# Altium PCB Grantv3.PcbDoc (part 1 of 3)
Units mm, origin at the board's own origin, x right, y up, seen from the top; angles counter-clockwise.
Board outline 132.82 x 71.6 mm, 2 copper layers (Top Layer, Bottom Layer), stack 1.448 mm thick; 97 components, 63 nets, 317 pads, 96 vias.
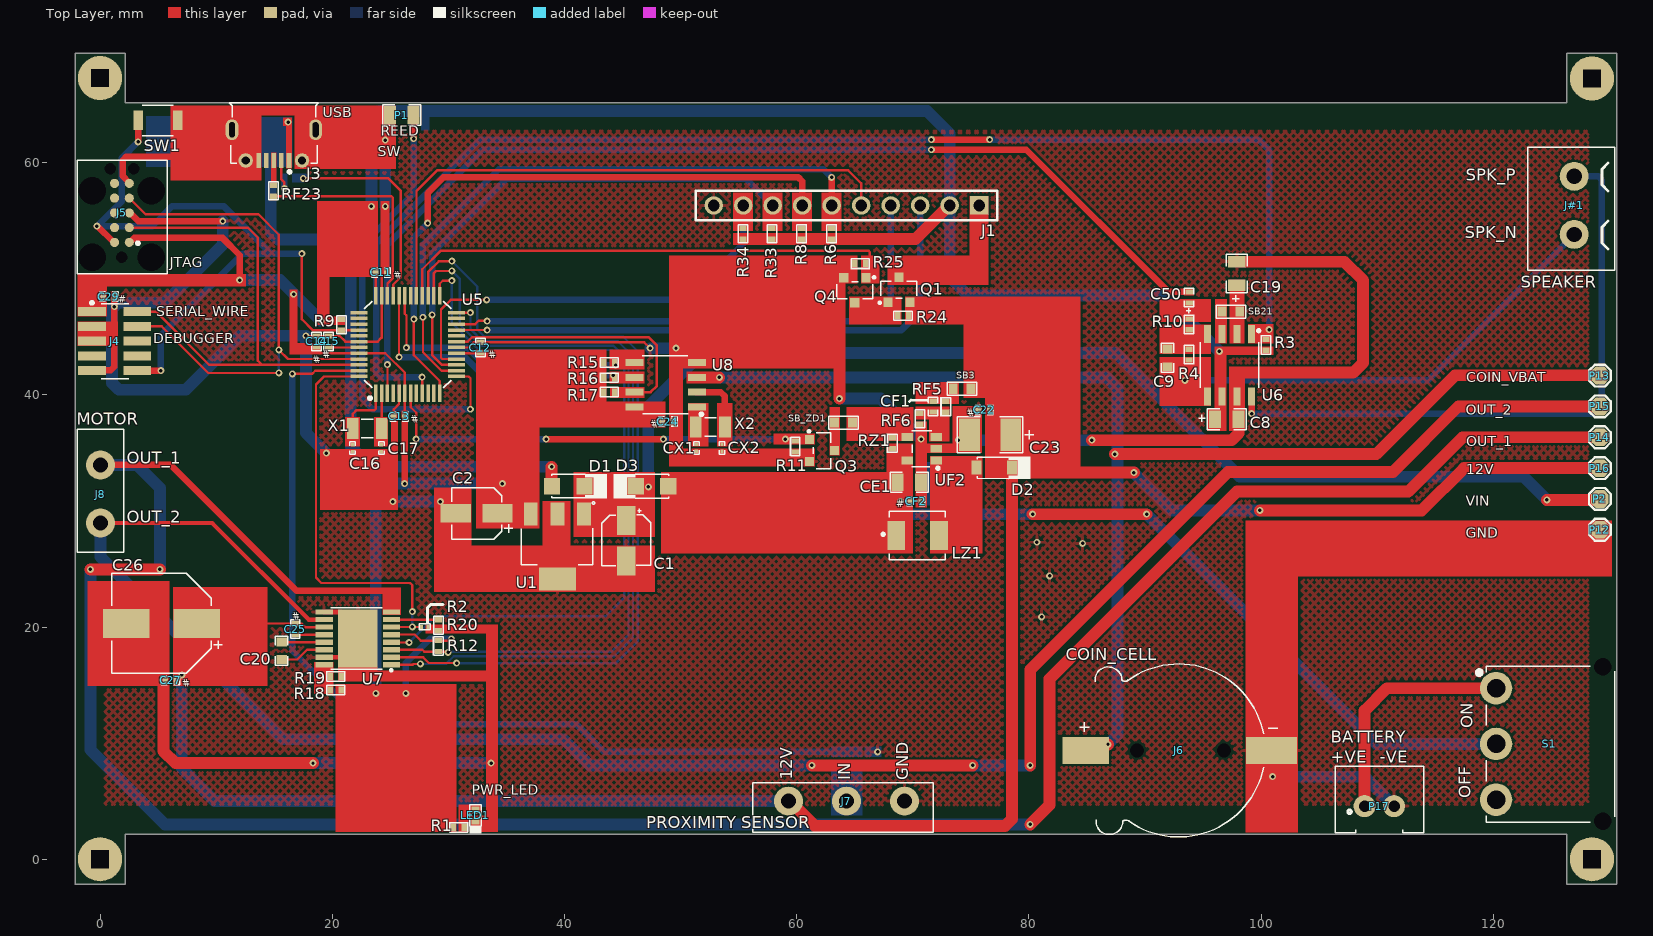
[diagram p0: Top Layer view]
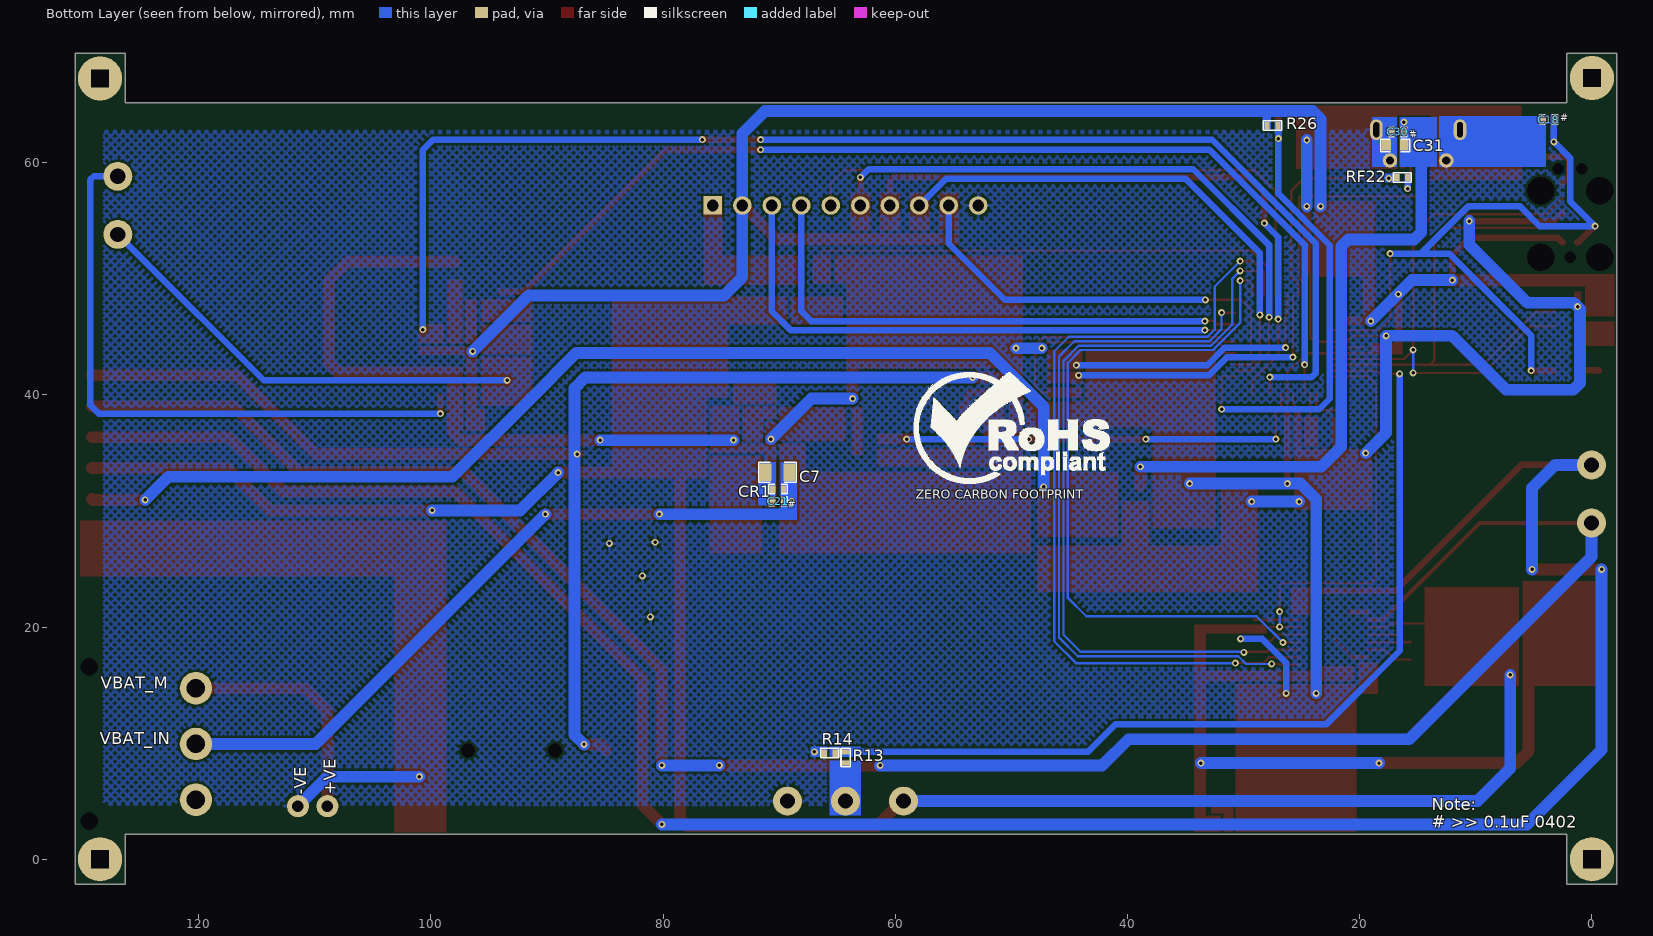
[diagram p1: Bottom Layer view, seen from below]
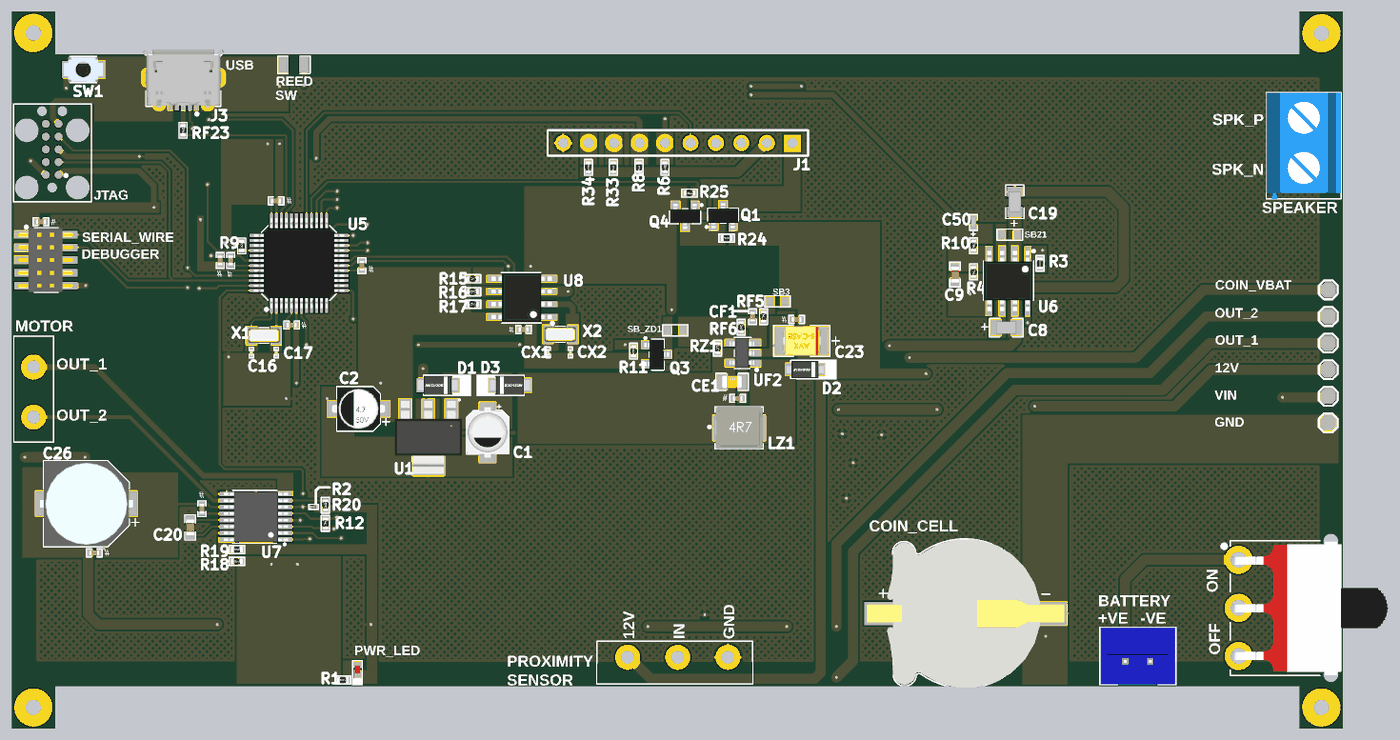
[diagram p3: 3D render of the assembled board from above, using the file's embedded part models]
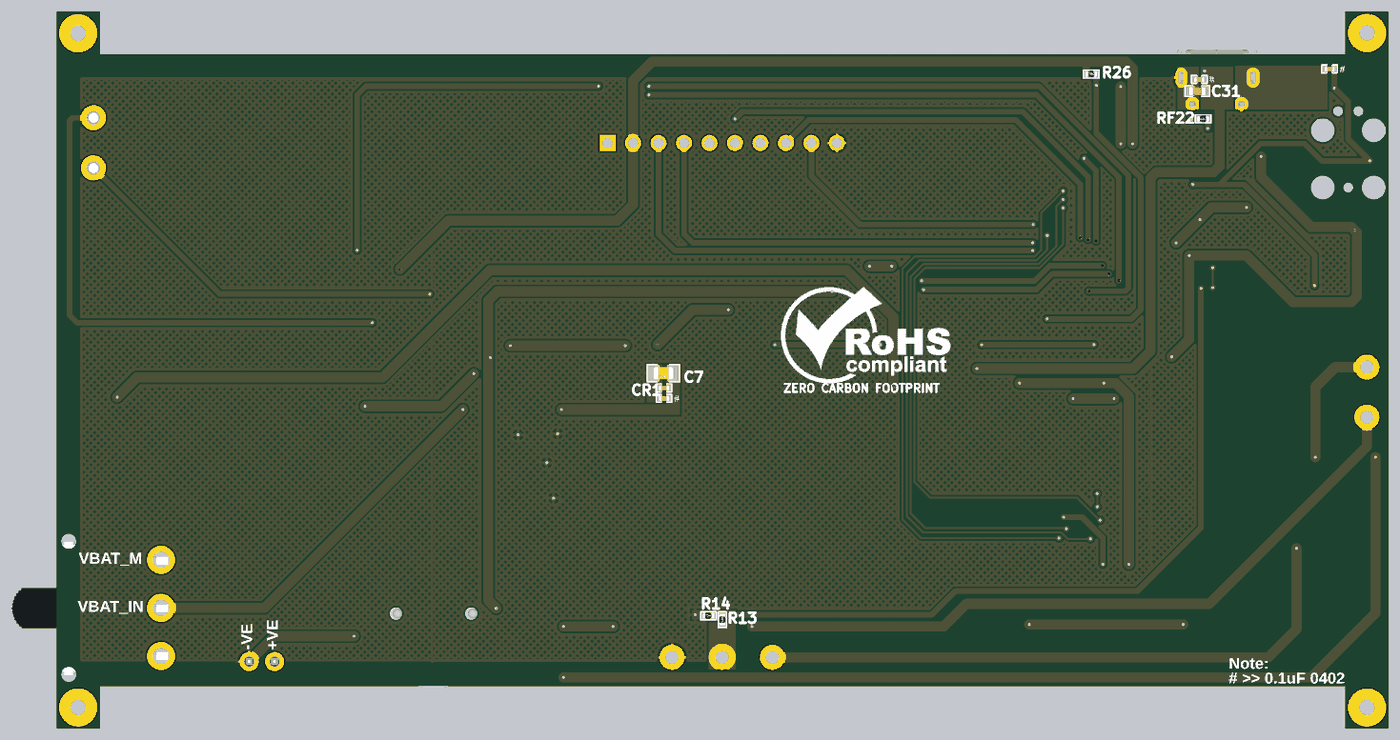
[diagram p4: 3D render of the assembled board from below, using the file's embedded part models]

## Layer stack, top to bottom
Top Solder: solder mask 0.0762, Solder Resist, Dk 3.5
Top Layer: signal copper 0.254
Dielectric 1: dielectric 0.9398, FR-4, Dk 4.8
Bottom Layer: signal copper 0.254
Bottom Solder: solder mask 0.0762, Solder Resist, Dk 3.5

## Board outline
-2.159,1.422 -2.159,64.44 -2.159,69.444 2.159,69.444 2.159,65.151 126.34,65.151 126.34,69.418 130.658,69.418 130.658,-2.159 126.34,-2.159 126.34,2.134 2.159,2.134 2.159,-2.159 -2.159,-2.159

## Design rules (kind name [scope] priority, off if disabled: settings)
Clearance [All] p1: gap=0.178 ignorepadtopadclearanceinfootprint=FALSE except(0.102: Arc-SMDPad Track-SMDPad SMDPad-SMDPad)
ComponentClearance [All] p1: gap=0 collisioncheckmode=3 verticalgap=0 showdistances=FALSE
MinimumSolderMaskSliver [All] p1: minsoldermaskwidth=0
PolygonConnect [All] p1: connectstyle=Relief reliefconductorwidth=0.254 reliefentries=4 polygonreliefangle="90 Angle" airgapwidth=0.254
RoutingVias [All] p1: holewidth=0.3 width=0.6 viastyle="Through Hole" minholewidth=0.3 minwidth=0.6 maxholewidth=0.3 maxwidth=0.6
SilkToSilkClearance [All] p1: silktosilkclearance=0
SilkToSolderMaskClearance [IsPad] p1: minsilkscreentomaskgap=0 clearancetoexposedcopper=TRUE
SolderMaskExpansion [All] p1: expansion=0.102 istentingtop=FALSE
Width [All] p1: maxlimit=1.016 minlimit=0.203 preferedwidth=0.559
26 further rules are at their usual default settings.

## Classes and differential pairs
component class U_OLED_Section: J1 Q1 Q4 R24 R25
component class U_Power_Section: C1 C2 D1 D3 LED1 P2 R1 U1
component class U_Audio_Amplifier_Section: C8 C9 C19 C50 J#1 R3 R4 R10 SB21 U6
component class U_Controller_Section: C11 C12 C13 C14 C15 C16 C17 C18 P1 R6 R8 R9 R26 R33 R34 SW1 U5 X1
component class U_Connector_Section: C29 C30 C31 J3 J4 J5 J6 J7 J8 P12 P13 P14 P15 P16 P17 RF22 RF23 S1
component class U_Peripheral_Section: C7 C20 C21 C22 C23 C24 C25 C26 C27 CE1 CF1 CF2 CR1 CX1 CX2 D2 LZ1 Q3 R2 R11 R12 R13 R14 R15 R16 R17 R18 R19 R20 RF5 RF6 RZ1 SB3 SB_ZD1 SS U7 U8 UF2 X2

## Components (designator, comment, footprint, x,y, rotation, side; value= is the part's Value field where it differs from the comment)
C1 "6.8uF" EEEHB1E6R8R 45.314,27.44 r270 top locked
C2 "10uF" RVT1E100M0405 32.439,29.794 r180 top locked
C7 "22uF" Cap0805 70.16,33.346 r0 bottom locked
C8 "1UF" TCP1A105M8R 97.053,37.897 r0 top locked value=1uF
C9 "25pF" "Cap 0603" 91.948,43.188 r270 top locked
C11 "0.1uF" "Cap 0402"#1 24.206,50.546 r0 top locked
C12 "0.1uF" "Cap 0402"#1 32.766,44.069 r90 top locked
C13 "0.1uF" "Cap 0402"#1 25.768,38.151 r180 top locked
C14 "0.1uF" "Cap 0402"#1 18.644,44.602 r90 top locked
C15 "0.1uF" "Cap 0402"#1 19.685,44.602 r90 top locked
C16 "20pF" "Cap 0201" 21.748,35.408 r90 top locked
C17 "20pF" "Cap 0201" 24.237,35.408 r90 top locked
C18 "0.1uF" "Cap 0402"#1 3.734,63.703 r0 bottom locked
C19 "1uF" TCP1A105M8R 97.917,50.452 r90 top locked
C20 "22nF" "Cap 0603" 15.639,17.956 r270 top locked
C21 "0.1uF" "Cap 0402"#1 70.096,30.836 r0 bottom locked
C22 "0.1uF" "Cap 0402"#1 76.149,38.71 r180 top locked
C23 "4.7UF" TAJB475K035RNJ 76.687,36.652 r0 top locked
C24 "0.1uF" "Cap 0402"#1 48.908,37.694 r0 top locked
C25 "0.1uF" "Cap 0402"#2 16.811,19.82 r270 top locked
C26 "100uF" UWX1E101MCL1GB 5.291,20.32 r180 top locked
C27 "0.1uF" "Cap 0402"#1 6.071,15.418 r180 top locked
C29 "0.1uF" "Cap 0402"#1 0.762,48.463 r0 top locked
C30 "0.1uF" "Cap 0402"#1 16.728,62.659 r0 bottom locked
C31 "4.7uF" "Cap 0603" 16.931,61.49 r0 bottom locked
C50 "330nF" TCTU1D334M8R 93.802,48.382 r90 top locked
CE1 "22uF" Cap0805 69.702,32.482 r0 top locked
CF1 "220pF" "Cap 0402"#1 71.755,38.989 r90 top locked
CF2 "0.1uF" "Cap 0402"#1 70.261,30.836 r0 top locked
CR1 "2.2uF" "Cap 0402"#1 70.096,31.877 r0 bottom locked
CX1 "20pF" "Cap 0201" 51.359,35.423 r90 top locked
CX2 "20pF" "Cap 0201" 53.569,35.423 r90 top locked
D1 "PMEG3010ER,115" SOD123W 40.335,32.136 r0 top locked
D2 "RB060M-30TR" SOD-123F 77.017,33.731 r0 top locked
D3 "PMEG3010ER,115" SOD123W 47.549,32.131 r180 top locked
J1 "C35445" C35445 64.289,56.314 r180 top locked
J3 "C10418" C10418 14.968,61.511 r180 top locked
J4 "20021121-00010C4LF" 20021121-00010C4LF 1.25,44.628 r270 top locked
J5 "TC2050-IDC" TC2050-IDC 1.88,51.867 r90 top locked
J6 "CR1220-2" CR1220-2 92.906,9.373 r0 top locked value=Cuctom
J7 "WJ301V-5.0-3P" WJ301V-5.0-3P 59.291,5.004 r0 top locked value=Custom
J8 "WJ301V-5.0-2P" WJ301V-5.0-2P 0.025,28.96 r270 top locked value=Custom
J#1 "WJ301V-5.0-2P" WJ301V-5.0-2P 126.975,58.826 r90 top locked value=Custom
LED1 "TJ-S1005SW4TGLC2R-A5" "LED 0402" 32.334,3.777 r270 top locked
LZ1 "MS0420-100M" MS0420-100M 70.413,27.889 r0 top locked value=10uH
P1 "SMD PAD" "SMD PAD" 25.988,64.105 r180 top locked
P2 "TEST POINT" "TEST POINT" 129.184,31.034 r270 top locked
P12 "Test Point" "TEST POINT" 129.184,28.377 r90 top locked
P13 "Test Point" "TEST POINT" 129.184,41.661 r0 top locked
P14 "Test Point" "TEST POINT" 129.184,36.347 r180 top locked
P15 "Test Point" "TEST POINT" 129.184,39.004 r180 top locked
P16 "Test Point" "TEST POINT" 129.184,33.691 r180 top locked
P17 "JST Connector" "JST Connector" 108.915,4.572 r0 top locked
Q1 "FDN338P" SOT23-3 68.809,49.06 r0 top locked
Q3 "ZVN3310FTA" SOT23-3 62.179,35.204 r270 top locked
Q4 "FDN335N" SOT23-3 65.014,49.001 r180 top locked
R1 "470R" Res0402#1 30.886,2.743 r180 top locked
R2 "1.5K" Res-0201 27.966,20.011 r180 top locked
R3 "20K" Res0402#1 100.432,44.305 r270 top locked
R4 "20K" Res0402#1 93.798,43.467 r90 top locked
R6 "10K" Res0402#1 63.017,53.886 r90 top locked
R8 "10K" Res0402#1 60.427,53.886 r90 top locked
R9 "20K" Res0402#1 20.777,46.038 r90 top locked
R10 "20K" Res0402#1 93.802,46.07 r90 top locked
R11 "10K" Res0402#1 59.876,35.547 r270 top locked
R12 "10K" Res0402#1 29.134,18.364 r270 top locked
R13 "133K" Res0402#2 64.27,8.763 r270 bottom locked
R14 "49.9K" Res0402#2 65.65,9.144 r0 bottom locked
R15 "10K" Res0402#1 43.853,42.769 r180 top locked
R16 "10K" Res0402#1 43.853,41.474 r180 top locked
R17 "10K" Res0402#1 43.853,40.229 r180 top locked
R18 "0R" Res0402#1 20.307,14.575 r180 top locked
R19 "0R" Res0402#1 20.307,15.744 r180 top locked
R20 "20K" Res0402#1 29.134,20.163 r90 top locked
R24 "47K" Res0402#1 69.164,46.812 r180 top
R25 "47K" Res0402#1 65.471,51.313 r0 top locked
R26 "1K" Res0402#2 27.508,63.195 r0 bottom locked
R33 "10K" Res0402#1 57.861,53.886 r90 top locked
R34 "10K" Res0402#2 55.372,53.886 r90 top locked
RF5 "118K" Res0402#1 72.847,38.976 r270 top locked
RF6 "13.3K" Res0402#1 70.612,37.935 r90 top locked
RF22 "0R" Res0402#1 16.345,58.725 r180 bottom locked
RF23 "0R" Res0402#1 14.935,57.582 r90 top locked
RZ1 "47K" Res0402#1 68.254,35.839 r270 top locked
S1 "SS-12D11L5" SS-12D11L5 124.841,9.931 r270 top locked value=Custom
SB3 "Solder Bridge" "Solder Bridge" 74.244,40.513 r0 top locked
SB21 "Solder Bridge" "Solder Bridge" 97.409,47.175 r0 top locked
SB_ZD1 "Solder Bridge" "Solder Bridge" 64.033,37.617 r180 top locked
SW1 "B3U-1000P" B3U-1000P 4.978,63.652 r0 top locked
U1 "SPX3940AM3-L-3-3/TR" SPX3940AM3-L-3-3/TR 39.395,26.948 r180 top locked
U5 "SAMD21G18A-AUT" SAMD21G18A-AUT 26.501,44.334 r90 top locked
U6 "LM4890MX/NOPB" SOIC-8 97.282,42.553 r270 top locked
U7 "DRV8876PWPR" 16HTSSOP 22.2,19.021 r180 top locked
U8 "MCP7940N-I/SN" MCP7940N-I/SN 48.714,40.869 r180 top locked
UF2 "LMR62014XMF/NOPB" SOT23-5 70.769,35.357 r180 top locked
X1 "NX3215SA-32.768K-STD-MUA-8" NX3215SA-32.768K-STD-MUA-8 23.013,37.11 r180 top locked
X2 "NX3215SA-32.768K-STD-MUA-8" NX3215SA-32.768K-STD-MUA-8 52.573,37.232 r180 top locked

## Footprints (in the part's own frame and the unit in brackets; to place one, negate y for a bottom-side part, rotate by r counter-clockwise, add the part's x,y. Pads: shape width x height; smd on the part's side, far side on the other; paste and mask are expansions set on the pad)
16HTSSOP [mm]
  rect 1.5x0.45 smd: 1(-2.9,2.275) 2(-2.9,1.625) 3(-2.9,0.975) 4(-2.9,0.325) 5(-2.9,-0.325) 6(-2.9,-0.975) 7(-2.9,-1.625) 8(-2.9,-2.275) 9(2.9,-2.275) 10(2.9,-1.625) 11(2.9,-0.975) 12(2.9,-0.325) 13(2.9,0.325) 14(2.9,0.975) 15(2.9,1.625) 16(2.9,2.275)
  rect 3.4x5 smd: 17(0,0)
  silkscreen extent -2.94,-2.64 2.31,2.81, body extent -3.2,-2.5 3.2,2.5, height 1.2
20021121-00010C4LF [mm]
  rect 0.76x2.4 smd: 1(-2.54,-1.95) 2(-2.54,1.95) 3(-1.27,-1.95) 4(-1.27,1.95) 5(0,-1.95) 6(0,1.95) 7(1.27,-1.95) 8(1.27,1.95) 9(2.54,-1.95) 10(2.54,1.95)
  silkscreen extent -3.43,-2.08 3.23,1.22, body extent -3.17,-2.78 3.18,2.72, height 4.5
B3U-1000P [mm] "SWITCH TACTILE SPST-NO 0.05A 12V"
  rect 0.82x1.72 smd: 1(-1.7,0) 2(1.7,0)
  silkscreen extent -1.35,-1.32 1.32,1.3, body extent -2,-1.26 2,1.24, height 1.6
C10418 [mm] "USB - Micro B Female USB 2 5 SMD USB Connectors RoHS"
  rect 0.4x1.25 smd: 1(-1.3,1.325) 2(-0.65,1.325) 3(0,1.325) 4(0.65,1.325) 5(1.3,1.325)
  round 1.25 hole 0.7: MH1(-2.425,1.325) MH2(2.425,1.325)
  oval 1.1x1.8 hole 0.5 slot 1.3 at 90 deg: MH3(3.6,-1.325) MH4(-3.6,-1.325)
  silkscreen extent -3.83,-3.63 3.83,2.43, body extent -4.02,-4.08 4.03,1.5, height 2.72
C35445 [mm]
  rect 1.6x1.6 hole 1: 1(-11.43,0)
  round 1.6 hole 1: 2(-8.89,0) 3(-6.35,0) 4(-3.81,0) 5(-1.27,0) 6(1.27,0) 7(3.81,0) 8(6.35,0) 9(8.89,0) 10(11.43,0)
  silkscreen extent -13,-1.28 12.98,1.27, body extent -12.95,-1.27 12.95,1.27, height 8.6
Cap0805 [mil] "SMD 0805"
  rect 40x60 smd: 1(-40,0) 2(40,0)
  silkscreen extent -64,-34 64,34, body extent -39,-25 39,25, height 30
"Cap 0201" [mm]
  rect 0.3x0.3 smd: 1(-0.3,0) 2(0.3,0)
  silkscreen extent -0.53,-0.23 0.53,0.23, body extent -0.3,-0.15 0.3,0.15, height 0.28
"Cap 0402"#1 [mil]
  rect 18x25 smd: 1(-18.5,0) 2(18.5,0)
  silkscreen extent -31,-16 31,16, body extent -20,-10 20,10, height 19
"Cap 0402"#2 [mil]
  rect 18x25 smd mask+2.36: 1(-18.5,0) 2(18.5,0)
  silkscreen extent -31,-16 31,16, body extent -20,-10 20,10, height 19
"Cap 0603" [mil]
  rect 30x35 smd: 1(-30,0) 2(30,0)
  silkscreen extent -49,-21 49,21, body extent -32,-16 31,16, height 34
CR1220-2 [mm]
  rect 4x2.3 smd: 1(-8,0)
  rect 4.4x2.3 smd: 2(8,0)
  round 0 hole 1.22 unplated: MH1(-3.6,0) MH2(3.9,0)
  silkscreen extent -8.5,-7.45 8.52,7.45, body extent -9.75,-7.45 9.95,7.45, height 4
EEEHB1E6R8R [mm] "EEE-HB1E6R8R"
  rect 2.5x1.6 smd: 1(-1.75,0) 2(1.75,0)
  silkscreen extent -2.74,-2.11 2.16,2.11, body extent -2.5,-2.15 2.5,2.15, height 5.8
"JST Connector" [mil] "2 Pin JST Connector"
  round 75 hole 39: 1(0,0) 2(100,0)
  silkscreen extent -100,-90 200,135, body extent -98,-89 198,135, height 284
"LED 0402" [mm]
  rect 0.62x0.72 smd: 1(-0.475,0) 2(0.475,0)
  silkscreen extent -0.91,-0.53 1.55,0.53, body extent -0.5,-0.25 0.51,0.25, height 0.45
MCP7940N-I/SN [mm]
  rect 1.55x0.6 smd: 1(-2.7,1.905) 2(-2.7,0.635) 3(-2.7,-0.635) 4(-2.7,-1.905) 5(2.7,-1.905) 6(2.7,-0.635) 7(2.7,0.635) 8(2.7,1.905)
  silkscreen extent -3.2,-2.51 2.03,2.67, body extent -3,-2.45 3,2.45, height 1.65
MS0420-100M [mm]
  rect 1.52x2.5 smd: 1(-1.85,0) 2(1.85,0)
  silkscreen extent -3.07,-2.1 2.41,2.1, body extent -2.37,-2.1 2.37,2.1, height 1.85
NX3215SA-32.768K-STD-MUA-8 [mm]
  rect 1x1.8 smd: 1(-1.25,0) 2(1.25,0)
  silkscreen extent -0.51,-0.79 0.51,0.79, body extent -1.6,-0.75 1.6,0.75, height 0.8
Res0402#1 [mil]
  rect 18x25 smd: 1(-18.5,0) 2(18.5,0)
  silkscreen extent -32,-17 32,16, body extent -23,-11 23,11, height 16
Res0402#2 [mil]
  rect 18x25 smd mask+4: 1(-18.5,0) 2(18.5,0)
  silkscreen extent -32,-17 32,16, body extent -23,-11 23,11, height 16
Res-0201 [mm]
  rect 0.27x0.37 smd: 1(-0.275,0) 2(0.275,0)
  silkscreen extent -0.48,-0.25 0.48,0.25, body extent -0.3,-0.15 0.3,0.15, height 0.29
RVT1E100M0405 [mm] "10uF 25V 5.4mm SMD"
  rect 2.6x1.6 smd: 1(-1.8,0) 2(1.8,0)
  silkscreen extent -3.1,-2.22 2.16,2.22, body extent -2.65,-2.15 2.65,2.15, height 5.7
SAMD21G18A-AUT [mm] "IC MCU 32BIT 256KB FLASH 48TQFP"
  rect 1.5x0.3 smd: 1(-4.2,2.75) 2(-4.2,2.25) 3(-4.2,1.75) 4(-4.2,1.25) 5(-4.2,0.75) 6(-4.2,0.25) 7(-4.2,-0.25) 8(-4.2,-0.75) 9(-4.2,-1.25) 10(-4.2,-1.75) 11(-4.2,-2.25) 12(-4.2,-2.75) 25(4.2,-2.75) 26(4.2,-2.25) 27(4.2,-1.75) 28(4.2,-1.25) 29(4.2,-0.75) 30(4.2,-0.25) 31(4.2,0.25) 32(4.2,0.75) 33(4.2,1.25) 34(4.2,1.75) 35(4.2,2.25) 36(4.2,2.75)
  rect 0.3x1.5 smd: 13(-2.75,-4.2) 14(-2.25,-4.2) 15(-1.75,-4.2) 16(-1.25,-4.2) 17(-0.75,-4.2) 18(-0.25,-4.2) 19(0.25,-4.2) 20(0.75,-4.2) 21(1.25,-4.2) 22(1.75,-4.2) 23(2.25,-4.2) 24(2.75,-4.2) 37(2.75,4.2) 38(2.25,4.2) 39(1.75,4.2) 40(1.25,4.2) 41(0.75,4.2) 42(0.25,4.2) 43(-0.25,4.2) 44(-0.75,4.2) 45(-1.25,4.2) 46(-1.75,4.2) 47(-2.25,4.2) 48(-2.75,4.2)
  silkscreen extent -4.75,-3.73 3.73,3.73, body extent -4.5,-4.5 4.5,4.5, height 1.42
"SMD PAD" [mil]
  rect 40x60 smd: 1(-40,0) 2(40,0)
  silkscreen extent -64,-34 64,34
SOD123W [mm] "DIODE SCHOTTKY 30V 1A SOD123W"
  rect 1.4x1.4 smd: A(-1.4,0) K(1.4,0)
  silkscreen extent -1.42,-1.07 3.33,1.07, body extent -2,-0.95 2,0.95, height 1.1
SOD-123F [mm]
  rect 0.85x1.2 smd: A(-1.525,0) K(1.525,0)
  silkscreen extent -1.48,-1 3.12,0.98, body extent -1.88,-0.88 1.87,0.82, height 1.2
SOIC-8 [mm]
  rect 1.55x0.6 smd: 1(-2.7,1.905) 2(-2.7,0.635) 3(-2.7,-0.635) 4(-2.7,-1.905) 5(2.7,-1.905) 6(2.7,-0.635) 7(2.7,0.635) 8(2.7,1.905)
  silkscreen extent -3.07,-2.51 1.96,2.62, body extent -3,-2.45 3,2.45, height 1.65
"Solder Bridge" [mil] "Solder Bridge ON"
  rect 30x35 smd: 1(-30,0) 2(30,0)
  silkscreen extent -50,-22 50,22
SOT23-3 [mm] "SOT23, 3-Leads, Body 2.9x1.3mm, Pitch 0.95mm, Lead Span 2.3mm - Reverse Pinning, IPC High Density"
  rect 0.8x0.8 smd: 1(-0.95,-1.075) 2(0.95,-1.075) 3(0,1.075)
  silkscreen extent -1.73,-1.19 1.55,0.74, body extent -1.5,-1.25 1.5,1.25, height 1.05
SOT23-5 [mil] "SOT23-5 Package"
  rect 40x27 smd: 1(-49.21,39.37) 2(-49.21,0) 3(-49.21,-39.37) 4(49.21,-39.37) 5(49.21,39.37)
  silkscreen extent -59,-61 33,70, body extent -46,-58 53,60, height 43
SPX3940AM3-L-3-3/TR [mm] "IC REG LINEAR 3.3V 1A SOT223"
  rect 1.2x2 smd: 1(-2.3,-2.8) 2(0,-2.8) 3(2.3,-2.8)
  rect 3.2x2 smd: 4(0,2.8)
  silkscreen extent -3.2,-3.84 3.1,1.6, body extent -3.35,-3.64 3.35,3.65, height 1.81
SS-12D11L5 [mm]
  round 2.8 hole 1.6: 1(-4.8,-4.6) 2(0,-4.6) 3(4.8,-4.6)
  round 0 hole 1.5 unplated: MH1(-6.65,4.6) MH2(6.65,4.6)
  silkscreen extent -6.71,-6.17 6.76,5.61, body extent -6.65,-5.39 6.7,10.3, height 6.85
TAJB475K035RNJ [mil]
  rect 70.87x110 smd: 1(-71,-3) 2(69,-3)
  silkscreen extent -112,-64 147,58, body extent -74,-61 72,55, height 77
TC2050-IDC [mil] "CBL PLUG-OF-NAILS 10-PIN W/LEGS"
  round 30.98 smd: 1(50,-25) 2(100,-25) 3(150,-25) 4(200,-25) 5(250,-25) 6(250,25) 7(200,25) 8(150,25) 9(100,25) 10(50,25)
  round 0 hole 93.5 unplated: MP1(0,-100) MP2(225,-100) MP3(225,100) MP4(0,100)
  round 0 hole 39.02 unplated: MP5(0,0) MP6(300,-39.96) MP7(300,39.96)
  silkscreen extent -56,-154 328,152
TCP1A105M8R [mil]
  rect 40x60 smd: 1(-40,0) 2(40,0)
  silkscreen extent -96,-36 66,36, body extent -39,-25 39,25, height 47
TCTU1D334M8R [mil]
  rect 18x25 smd: 1(-18.5,0) 2(18.5,0)
  silkscreen extent -53,-16 31,16, body extent -20,-10 20,10, height 22
"TEST POINT" [mil]
  oct 60x60 smd: 1(0,0)
  silkscreen extent -37,-37 37,37
UWX1E101MCL1GB [mm]
  rect 4x2.5 smd: 1(-3.05,0) 2(3.05,0)
  silkscreen extent -5.23,-4.3 4.27,4.3, body extent -4.65,-4.25 4.65,4.25, height 5.5
WJ301V-5.0-2P [mm]
  round 2.5 hole 1.3: 1(-5,0) 2(0,0)
  silkscreen extent -8.07,-1.98 2.5,2.01
WJ301V-5.0-3P [mm]
  round 2.5 hole 1.3: 1(0,0) 2(5,0) 3(10,0)
  silkscreen extent -3.1,-2.67 12.49,1.6

## Part data
C1: library part EEEHB1E6R8R, "CAP ALUM 6.8UF 20% 25V SMD", Case/Package=Radial, Leakage Current=3uA, Manufacturer=Panasonic, Manufacturer Part Number=EEE-HB1E6R8R, Max Operating Temperature=105°C, Min Operating Temperature=-40°C, Package Quantity=2000, Ripple Current=25mA, Supplier Part Number 1=PCE4142CT-ND, Tolerance=20%, Voltage=25V, Capacitance=6.8uF, Category="Aluminum Electrolytic Capacitors", ComponentLink1Description=https://datasheet.ciiva.com/11784/0900766b806bc524-11784635.pdf?src-supplier=RSComponents, ComponentLink1URL=https://datasheet.ciiva.com/11784/0900766b806bc524-11784635.pdf?src-supplier=RSComponents, ComponentLink2Description=https://datasheet.ciiva.com/7903/1790623-7903207.pdf?src-supplier=Element14, ComponentLink2URL=https://datasheet.ciiva.com/7903/1790623-7903207.pdf?src-supplier=Element14, ComponentLink3Description=https://datasheet.ciiva.com/14592/70068251-14592830.pdf?src-supplier=Allied+Electronics, ComponentLink3URL=https://datasheet.ciiva.com/14592/70068251-14592830.pdf?src-supplier=Allied+Electronics, ComponentLink4Description=https://datasheet.ciiva.com/14596/70068251-14596488.pdf?src-supplier=Allied+Electronics, ComponentLink4URL=https://datasheet.ciiva.com/14596/70068251-14596488.pdf?src-supplier=Allied+Electronics, ComponentLink5Description=https://datasheet.ciiva.com/11681/aba0000ce4-11681133.pdf?src-supplier=Avnet, ComponentLink5URL=https://datasheet.ciiva.com/11681/aba0000ce4-11681133.pdf?src-supplier=Avnet, ComponentLink6Description=https://datasheet.ciiva.com/30226/16aba0000ce4-30226095.pdf?src-supplier=Onlinecomponents.com, ComponentLink6URL=https://datasheet.ciiva.com/30226/16aba0000ce4-30226095.pdf?src-supplier=Onlinecomponents.com, Construction=Cylindrical, Diameter=4mm, Height=5.8mm, Height - Seated (Max)=0.228inch, Lead Free="Lead Free", Length=5.5mm, Life (Hours)=2000Hour, Mount="Surface Mount,PCB", Packaging="Tape and Reel", Polarity=Polar, Pricing 1="1=0.43000, 10=0.29300, 50=0.19560, 100=0.16620, 500=0.11730, 1000=0.10264 (USD)", Radiation Hardening=No, REACH SVHC=Unknown, Ripple Current (AC)=25mA, RoHS=Yes, RoHS Compliant=Yes, Series=HB, Stock 1=1546, Supplier 1=Digi-Key, Termination=SMD/SMT, Voltage Rating=25V, Voltage Rating (DC)=25V, Width=650um
C2: library part RVT1E100M0405, "CAP ALUM 10uF 25V SMD", Manufacturer=ROQANG, Operating Temperature=-45℃~+105℃, Rated Voltage=25V, Tolerance=±20%, Capacitance=10uF, L=5.4mm, φD=4mm
C7 CE1: library part GRM21BR61E226ME44L, "CAP CER 22UF 25V X5R 0805", Case Code (Imperial)=0805, Case Code (Metric)=2012, Dielectric=X5R, Manufacturer=Murata, Max Operating Temperature=85°C, Min Operating Temperature=-55°C, Package Quantity=3000, Supplier Part Number 1=490-10749-1-ND, Tolerance=20%, Voltage=25V, Capacitance=22uF, Case/Package=0805, ComponentLink1Description=http://www.farnell.com/datasheets/2048737.pdf?src-supplier=Farnell, ComponentLink1URL=http://www.farnell.com/datasheets/2048737.pdf?src-supplier=Farnell, ComponentLink2Description=http://www.farnell.com/datasheets/2048737.pdf?src-supplier=Element14, ComponentLink2URL=http://www.farnell.com/datasheets/2048737.pdf?src-supplier=Element14, Composition=Ceramic, Depth=1.25mm, Height=1.25mm, Lead Free="Lead Free", Length=2mm, Manufacturer Part Number=GRM21BR61E226ME44L, Material=Ceramic, Mount="Surface Mount", Packaging="Tape and Reel", Pricing 1="1=0.54, 10=0.383, 100=0.2521, 500=0.18672, 1000=0.15871 (USD)", REACH SVHC="No SVHC", Stock 1=469852, Supplier 1=Digi-Key, Termination=SMD/SMT, Thickness=0.057inch, Voltage Rating=25V, Voltage Rating (DC)=25V, Weight=0.000335oz, Width=1.25mm
C8 C19: library part TCP1A105M8R, "1uF 10V ±20% 0805 Tantalum Capacitors ROHS", Manufacturer=ROHM, Package=0805, ComponentLink1Description=LCSC, ComponentLink1URL=https://lcsc.com/product-detail/Tantalum-Capacitors_ROHM-Semicon-TCP1A105M8R_C1952948.html, Manufacturer Part No=TCP1A105M8R
C9: library part CC0603JRNPO9BN250, "CAP CER 25PF 50V C0G/NPO 0603", Manufacturer=YAGEO, Package=0603, Manufacturer Part No=CC0603JRNPO9BN250
C11 C12 C13 C14: library part CC0402KRX7R7BB104, "CAP CER 0.1UF 16V X7R 0402", Capacitance=100nF, Case/Package=0402, Case Code (Metric)=1005, Dielectric=X7R, Manufacturer=Yageo, Max Operating Temperature=125°C, Min Operating Temperature=-55°C, Package Quantity=1, Supplier Part Number 1=311-1338-1-ND, Tolerance=10%, Voltage=16V, Case Code (Imperial)=0402, ComponentLink1Description=http://www.yageo.com/documents/recent/UPY-GPHC_X7R_6.3V-to-50V_8.pdf?src-supplier=Avnet+Europe, ComponentLink1URL=http://www.yageo.com/documents/recent/UPY-GPHC_X7R_6.3V-to-50V_8.pdf?src-supplier=Avnet+Europe, ComponentLink2Description=http://www.yageo.com/documents/recent/UPY-GPHC_X7R_6.3V-to-50V_18.pdf?src-supplier=Digi-Key, ComponentLink2URL=http://www.yageo.com/documents/recent/UPY-GPHC_X7R_6.3V-to-50V_18.pdf?src-supplier=Digi-Key, ComponentLink3Description=http://www.yageo.com/documents/recent/UPY-GPHC_X7R_6.3V-to-50V_8.pdf?src-supplier=Avnet, ComponentLink3URL=http://www.yageo.com/documents/recent/UPY-GPHC_X7R_6.3V-to-50V_8.pdf?src-supplier=Avnet, ComponentLink4Description=http://www.yageo.com/documents/recent/UPY-GPHC_X7R_6.3V-to-50V_18.pdf?src-supplier=Mouser, ComponentLink4URL=http://www.yageo.com/documents/recent/UPY-GPHC_X7R_6.3V-to-50V_18.pdf?src-supplier=Mouser, ComponentLink5Description=http://www.farnell.com/datasheets/2167236.pdf?src-supplier=Element14, ComponentLink5URL=http://www.farnell.com/datasheets/2167236.pdf?src-supplier=Element14, ComponentLink6Description=http://www.farnell.com/datasheets/1489800.pdf?src-supplier=Element14, ComponentLink6URL=http://www.farnell.com/datasheets/1489800.pdf?src-supplier=Element14, Composition=Ceramic, Depth=0.5mm, Halogen Free="Halogen Free", Height=0.5mm, Lead Free="Lead Free", Length=1mm, Manufacturer Part Number=CC0402KRX7R7BB104, Mount="Surface Mount", Number of Pins=2, Packaging="Tape and Reel", Pricing 1="1=0.1, 10=0.034, 100=0.015, 500=0.0107, 1000=0.00841, 2500=0.00764, 5000=0.00703 (USD)", Radiation Hardening=No, REACH SVHC="No SVHC", Stock 1=16982736, Supplier 1=Digi-Key, Termination=SMD/SMT, Thickness=0.022inch, Voltage Rating=16V, Voltage Rating (DC)=16V, Width=0.02inch
C15 C18 C21 C22 C24 C25 C27 C29 C30 CF2: library part CC0402KRX7R7BB104, "CAP CER 0.1UF 16V X7R 0402", Capacitance=100nF, Case Code (Imperial)=0402, Case Code (Metric)=1005, Dielectric=X7R, Manufacturer=Yageo, Max Operating Temperature=125°C, Min Operating Temperature=-55°C, Package Quantity=1, Supplier Part Number 1=311-1338-1-ND, Tolerance=10%, Voltage=16V, Case/Package=0402, ComponentLink1Description=http://www.yageo.com/documents/recent/UPY-GPHC_X7R_6.3V-to-50V_8.pdf?src-supplier=Avnet+Europe, ComponentLink1URL=http://www.yageo.com/documents/recent/UPY-GPHC_X7R_6.3V-to-50V_8.pdf?src-supplier=Avnet+Europe, ComponentLink2Description=http://www.yageo.com/documents/recent/UPY-GPHC_X7R_6.3V-to-50V_18.pdf?src-supplier=Digi-Key, ComponentLink2URL=http://www.yageo.com/documents/recent/UPY-GPHC_X7R_6.3V-to-50V_18.pdf?src-supplier=Digi-Key, ComponentLink3Description=http://www.yageo.com/documents/recent/UPY-GPHC_X7R_6.3V-to-50V_8.pdf?src-supplier=Avnet, ComponentLink3URL=http://www.yageo.com/documents/recent/UPY-GPHC_X7R_6.3V-to-50V_8.pdf?src-supplier=Avnet, ComponentLink4Description=http://www.yageo.com/documents/recent/UPY-GPHC_X7R_6.3V-to-50V_18.pdf?src-supplier=Mouser, ComponentLink4URL=http://www.yageo.com/documents/recent/UPY-GPHC_X7R_6.3V-to-50V_18.pdf?src-supplier=Mouser, ComponentLink5Description=http://www.farnell.com/datasheets/2167236.pdf?src-supplier=Element14, ComponentLink5URL=http://www.farnell.com/datasheets/2167236.pdf?src-supplier=Element14, ComponentLink6Description=http://www.farnell.com/datasheets/1489800.pdf?src-supplier=Element14, ComponentLink6URL=http://www.farnell.com/datasheets/1489800.pdf?src-supplier=Element14, Composition=Ceramic, Depth=0.5mm, Halogen Free="Halogen Free", Height=0.5mm, Lead Free="Lead Free", Length=1mm, Manufacturer Part Number=CC0402KRX7R7BB104, Mount="Surface Mount", Number of Pins=2, Packaging="Tape and Reel", Pricing 1="1=0.1, 10=0.034, 100=0.015, 500=0.0107, 1000=0.00841, 2500=0.00764, 5000=0.00703 (USD)", Radiation Hardening=No, REACH SVHC="No SVHC", Stock 1=16982736, Supplier 1=Digi-Key, Termination=SMD/SMT, Thickness=0.022inch, Voltage Rating=16V, Voltage Rating (DC)=16V, Width=0.02inch
C16 C17 CX1 CX2: library part GJM0336C1E200JB01D, "CAP CER 20PF 25V C0H 0201", Case Code (Imperial)=0201, Case Code (Metric)=0603, Manufacturer=Murata, Max Operating Temperature=125°C, Min Operating Temperature=-55°C, Supplier Part Number 1=490-13313-1-ND, Tolerance=5%, Voltage Rating=25V, Capacitance=20pF, Case/Package=0201, ComponentLink1Description=http://www.mouser.com/ds/2/281/c02e-2905.pdf?src-supplier=Mouser, ComponentLink1URL=http://www.mouser.com/ds/2/281/c02e-2905.pdf?src-supplier=Mouser, ComponentLink2Description=http://search.murata.co.jp/Ceramy/image/img/A01X/partnumbering_e_01.pdf?src-supplier=Digi-Key, ComponentLink2URL=http://search.murata.co.jp/Ceramy/image/img/A01X/partnumbering_e_01.pdf?src-supplier=Digi-Key, Lead Free="Lead Free", Length=0.024inch, Manufacturer Part Number=GJM0336C1E200JB01D, Mount="Surface Mount", Packaging="Tape and Reel", Pricing 1="1=0.1, 10=0.074, 100=0.0329, 500=0.02348, 1000=0.01845, 2500=0.01678, 5000=0.01543 (USD)", Stock 1=13650, Supplier 1=Digi-Key, Termination=SMD/SMT, Thickness=0.013inch, Voltage Rating (DC)=25V, Width=0.012inch
C20: library part CGA3E2X7R2A223K080AA, "CAP CER 0.022UF 100V X7R 0603", Case Code (Imperial)=0603, Case Code (Metric)=1608, Dielectric=X7R, Manufacturer=TDK, Max Operating Temperature=125°C, Min Operating Temperature=-55°C, Package Quantity=1, Ratings=AEC-Q200, Resistor Type=Ceramic, Supplier Part Number 1=445-5814-1-ND, Tolerance=10%, Voltage Rating=100V, Capacitance=22nF, Case/Package=0603, Category="Ceramic Capacitors", ComponentLink1Description=https://datasheet.ciiva.com/22725/1735406-22725648.pdf?src-supplier=Element14, ComponentLink1URL=https://datasheet.ciiva.com/22725/1735406-22725648.pdf?src-supplier=Element14, ComponentLink2Description=https://datasheet.ciiva.com/24218/cga3e2x7r2a223k080aa-266292-24218959.pdf?src-supplier=Mouser, ComponentLink2URL=https://datasheet.ciiva.com/24218/cga3e2x7r2a223k080aa-266292-24218959.pdf?src-supplier=Mouser, ComponentLink3Description=https://datasheet.ciiva.com/7975/1807242-7975349.pdf?src-supplier=Element14, ComponentLink3URL=https://datasheet.ciiva.com/7975/1807242-7975349.pdf?src-supplier=Element14, Depth=0.8mm, Height=0.8mm, Length=1.6mm, Manufacturer Part Number=CGA3E2X7R2A223K080AA, Mount="Surface Mount", Packaging="Tape and Reel", Pricing 1="1=0.11000, 10=0.07600, 50=0.04340, 100=0.03590, 500=0.02516, 1000=0.02083 (USD)", REACH SVHC="No SVHC", RoHS=Yes, RoHS Compliant=Yes, Series=CGA, Stock 1=56079, Supplier 1=Digi-Key, Termination=SMD/SMT, Thickness=0.035inch, Voltage Rating (DC)=100V, Weight=7.1E-05oz, Width=0.031inch
C23: library part TAJB475K035RNJ, "CAP TANT 4.7UF 10% 35V 1411", Capacitance=4.7uF, Case Code (Imperial)=1210, Case Code (Metric)=3528, Dielectric Material=Tantalum, ESR (Equivalent Series Resistance)=3.1R, Leakage Current=1.6uA, Manufacturer="Kyocera AVX", Max Operating Temperature=125°C, Min Operating Temperature=-55°C, Package Quantity=1, Supplier Part Number 1=478-1691-1-ND, Tolerance=20%, Voltage=35V, Case/Package=1210, ComponentLink1Description=http://uk.rs-online.com/webdocs/0ccd/0900766b80ccdc61.pdf?src-supplier=RSComponents, ComponentLink1URL=http://uk.rs-online.com/webdocs/0ccd/0900766b80ccdc61.pdf?src-supplier=RSComponents, ComponentLink2Description=http://www.farnell.com/datasheets/1826076.pdf?src-supplier=Element14, ComponentLink2URL=http://www.farnell.com/datasheets/1826076.pdf?src-supplier=Element14, ComponentLink3Description=http://datasheets.avx.com/TAJ.pdf?src-supplier=Digi-Key, ComponentLink3URL=http://datasheets.avx.com/TAJ.pdf?src-supplier=Digi-Key, ComponentLink4Description=http://www.avx.com/docs/Catalogs/taj.pdf?src-supplier=Farnell, ComponentLink4URL=http://www.avx.com/docs/Catalogs/taj.pdf?src-supplier=Farnell, ComponentLink5Description=https://www.alliedelec.com/m/d/9166fb755e7ffffad4c533f86d810ce4.pdf?src-supplier=Allied+Electronics, ComponentLink5URL=https://www.alliedelec.com/m/d/9166fb755e7ffffad4c533f86d810ce4.pdf?src-supplier=Allied+Electronics, ComponentLink6Description=https://www.distrelec.biz/Web/Downloads/_e/ng/taj_ENG.pdf?mime=application%2Fpdf&src-supplier=Distrelec, ComponentLink6URL=https://www.distrelec.biz/Web/Downloads/_e/ng/taj_ENG.pdf?mime=application%2Fpdf&src-supplier=Distrelec, ComponentLink7Description=http://www.avx.com/docs/catalogs/taj.pdf?src-supplier=Avnet+Europe, ComponentLink7URL=http://www.avx.com/docs/catalogs/taj.pdf?src-supplier=Avnet+Europe, ComponentLink8Description=http://www.avx.com/docs/catalogs/taj.pdf?src-supplier=Avnet, ComponentLink8URL=http://www.avx.com/docs/catalogs/taj.pdf?src-supplier=Avnet, ComponentLink9Description=http://www.avxcorp.com/docs/Catalogs/taj.pdf?src-supplier=Future+Electronics, ComponentLink9URL=http://www.avxcorp.com/docs/Catalogs/taj.pdf?src-supplier=Future+Electronics, ComponentLink10Description=http://www.mouser.com/ds/2/40/taj-776811.pdf?src-supplier=Mouser, ComponentLink10URL=http://www.mouser.com/ds/2/40/taj-776811.pdf?src-supplier=Mouser, ComponentLink11Description=https://www.verical.com/server-webapp/html/getDatasheet?partID=149140&src-supplier=Verical, ComponentLink11URL=https://www.verical.com/server-webapp/html/getDatasheet?partID=149140&src-supplier=Verical, Depth=2.8mm, Dissipation Factor=6%, Features="General Purpose", Height=1.9mm, Height - Seated (Max)=0.083inch, Lead Free="Lead Free", Length=3.5mm, Manufacturer Part Number=TAJB475K035RNJ, Mount="Surface Mount,PCB", Number of Pins=2, Packaging="Tape and Reel", Polarity=Polar, Pricing 1="1=0.71, 10=0.505, 100=0.3322, 500=0.2461, 1000=0.20919 (USD)", Radiation Hardening=No, REACH SVHC="No SVHC", Stock 1=3949, Supplier 1=Digi-Key, Termination=SMD/SMT, Voltage Rating=35V, Voltage Rating (DC)=35V, Weight=0.000564oz, Width=2.8mm
C26: library part UWX1E101MCL1GB, "CAP ALUM 100UF 20% 25V SMD", Case/Package=Radial, Dielectric Material=Aluminium, Leakage Current=3uA, Manufacturer=Nichicon, Max Operating Temperature=85°C, Min Operating Temperature=-40°C, Package Quantity=1000, Ripple Current=110mA, Supplier Part Number 1=493-2113-6-ND, Tolerance=20%, Voltage=25V, Capacitance=100uF, Category="Aluminum Electrolytic Capacitors", ComponentLink1Description=http://nichicon-us.com/english/products/pdfs/e-uwx.pdf?src-supplier=Digi-Key, ComponentLink1URL=http://nichicon-us.com/english/products/pdfs/e-uwx.pdf?src-supplier=Digi-Key, ComponentLink2Description=http://www.nichicon.co.jp/english/products/pdfs/e-ch_ref.pdf?src-supplier=Mouser, ComponentLink2URL=http://www.nichicon.co.jp/english/products/pdfs/e-ch_ref.pdf?src-supplier=Mouser, ComponentLink3Description=http://www.nichicon.co.jp/english/products/pdfs/e-wx.pdf?src-supplier=Avnet, ComponentLink3URL=http://www.nichicon.co.jp/english/products/pdfs/e-wx.pdf?src-supplier=Avnet, ComponentLink4Description=http://uk.rs-online.com/webdocs/0fa3/0900766b80fa3a90.pdf?src-supplier=RSComponents, ComponentLink4URL=http://uk.rs-online.com/webdocs/0fa3/0900766b80fa3a90.pdf?src-supplier=RSComponents, ComponentLink5Description=http://nichicon-us.com/english/products/pdfs/e-wx.pdf?src-supplier=Future+Electronics, ComponentLink5URL=http://nichicon-us.com/english/products/pdfs/e-wx.pdf?src-supplier=Future+Electronics, ComponentLink6Description=http://www.nichicon.co.jp/english/products/pdfs/e-ch_ref.pdf?src-supplier=Avnet+Europe, ComponentLink6URL=http://www.nichicon.co.jp/english/products/pdfs/e-ch_ref.pdf?src-supplier=Avnet+Europe, ComponentLink7Description=http://www.farnell.com/datasheets/2364658.pdf?src-supplier=Element14, ComponentLink7URL=http://www.farnell.com/datasheets/2364658.pdf?src-supplier=Element14, ComponentLink8Description=https://datasheet.ciiva.com/11778/0900766b80fa3a90-11778418.pdf?src-supplier=RSComponents, ComponentLink8URL=https://datasheet.ciiva.com/11778/0900766b80fa3a90-11778418.pdf?src-supplier=RSComponents, ComponentLink9Description=https://datasheet.ciiva.com/17527/e-wx-17527624.pdf?src-supplier=Avnet+Europe, ComponentLink9URL=https://datasheet.ciiva.com/17527/e-wx-17527624.pdf?src-supplier=Avnet+Europe, ComponentLink10Description=https://datasheet.ciiva.com/5361/e-wx-11809-5361100.pdf?src-supplier=Mouser, ComponentLink10URL=https://datasheet.ciiva.com/5361/e-wx-11809-5361100.pdf?src-supplier=Mouser, ComponentLink11Description=https://datasheet.ciiva.com/28458/1912851-28458684.pdf?src-supplier=Element14, ComponentLink11URL=https://datasheet.ciiva.com/28458/1912851-28458684.pdf?src-supplier=Element14, ComponentLink12Description=https://datasheet.ciiva.com/96/e-wx-96650.pdf?src-supplier=Digi-Key, ComponentLink12URL=https://datasheet.ciiva.com/96/e-wx-96650.pdf?src-supplier=Digi-Key, ComponentLink13Description=https://datasheet.ciiva.com/96/e-wx-96651.pdf?src-supplier=Digi-Key, ComponentLink13URL=https://datasheet.ciiva.com/96/e-wx-96651.pdf?src-supplier=Digi-Key, ComponentLink14Description=https://datasheet.ciiva.com/96/e-wx-96652.pdf?src-supplier=Digi-Key, ComponentLink14URL=https://datasheet.ciiva.com/96/e-wx-96652.pdf?src-supplier=Digi-Key, ComponentLink15Description=https://datasheet.ciiva.com/11687/e-wx-11687148.pdf?src-supplier=Avnet, ComponentLink15URL=https://datasheet.ciiva.com/11687/e-wx-11687148.pdf?src-supplier=Avnet, ComponentLink16Description=https://datasheet.ciiva.com/16512/e-wx-16512638.pdf?src-supplier=Future+Electronics, ComponentLink16URL=https://datasheet.ciiva.com/16512/e-wx-16512638.pdf?src-supplier=Future+Electronics, Construction=Cylindrical, Diameter=8mm, Dissipation Factor=0.14%, Height=5.4mm, Height - Seated (Max)=0.213inch, Lead Diameter=0.8mm, Lead Free="Lead Free", Lead Pitch=2.3mm, Length=5.4mm, Life (Hours)=2000Hour, Manufacturer Part Number=UWX1E101MCL1GB, Mount="Surface Mount", Number of Pins=2, Packaging="Tape and Reel", Polarity=Polar, Pricing 1="1=0.43, 10=0.301, 50=0.211, 100=0.1808, 500=0.13558 (USD)", Pricing 2="1=0.43000, 10=0.30100, 50=0.21100, 100=0.18080, 500=0.13558 (USD)", Radiation Hardening=No, REACH SVHC="No SVHC", Ripple Current (AC)=110mA, RoHS=Yes, RoHS Compliant=Yes, Series=WX, Stock 1=30613, Stock 2=25010, Supplier 1=Digi-Key, Supplier 2=Digi-Key, Supplier Part Number 2=493-2113-1-ND, Termination=SMD/SMT, Voltage Rating=25V, Voltage Rating (DC)=25V, Weight=0.01lb, Width=0.25inch
C31: library part CL10A475KA8NQNC, "CAP CER 4.7UF 25V X5R 0603", Case Code (Imperial)=0603, Case Code (Metric)=1608, Dielectric=X5R, Manufacturer=Samsung, Max Operating Temperature=85°C, Min Operating Temperature=-55°C, Package Quantity=1, Supplier Part Number 1=1276-1900-1-ND, Tolerance=10%, Voltage Rating=25V, Capacitance=4.7uF, Case/Package=0603, ComponentLink1Description=http://www.samsungsem.com/kr/support/product-search/mlcc/CL10A475KA8NQNC.jsp?src-supplier=Digi-Key, ComponentLink1URL=http://www.samsungsem.com/kr/support/product-search/mlcc/CL10A475KA8NQNC.jsp?src-supplier=Digi-Key, Contact Plating=Tin, Depth=0.8mm, Lead Free="Lead Free", Length=1.6mm, Manufacturer Part Number=CL10A475KA8NQNC, Mount="Surface Mount", Packaging="Tape and Reel", Pricing 1="1=0.37, 10=0.255, 100=0.1528, 500=0.11456, 1000=0.09675 (USD)", Stock 1=2252340, Supplier 1=Digi-Key, Termination=Wraparound, Thickness=0.035inch, Width=0.031inch
C50: library part TCTU1D334M8R, "CAP TANT 0.33 uF 20 V ±20% 0402", Case Code (Imperial)=0402, Case Code (Metric)=1005, Leakage Current=700nA, Manufacturer=Rohm, Max Operating Temperature=125°C, Min Operating Temperature=-55°C, Package Quantity=10000, Supplier Part Number 1=511-1684-1-ND, Tolerance=20%, Voltage Rating=20V, Capacitance=330nF, Case/Package=0402, Category="Tantalum Capacitors", ComponentLink1Description=https://datasheet.ciiva.com/29503/tct-u-29503913.pdf?src-supplier=Digi-Key, ComponentLink1URL=https://datasheet.ciiva.com/29503/tct-u-29503913.pdf?src-supplier=Digi-Key, ComponentLink2Description=https://datasheet.ciiva.com/29503/tct-u-29503914.pdf?src-supplier=Digi-Key, ComponentLink2URL=https://datasheet.ciiva.com/29503/tct-u-29503914.pdf?src-supplier=Digi-Key, ComponentLink3Description=https://datasheet.ciiva.com/29503/tct-u-29503915.pdf?src-supplier=Digi-Key, ComponentLink3URL=https://datasheet.ciiva.com/29503/tct-u-29503915.pdf?src-supplier=Digi-Key, Dissipation Factor=20%, Features="General Purpose", Height=0.6mm, Height - Seated (Max)=0.024inch, Lead Free="Lead Free", Length=0.039inch, Manufacturer Part Number=TCTU1D334M8R, Mount="Surface Mount", Packaging="Tape and Reel", Pricing 1="1=0.52000, 10=0.36800, 50=0.27800, 100=0.24220, 500=0.17940, 1000=0.15249, 2500=0.14352, 5000=0.13455 (USD)", RoHS=Yes, RoHS Compliant=Yes, Stock 1=28079, Supplier 1=Digi-Key, Termination=SMD/SMT, Voltage Rating (DC)=20V, Width=0.5mm
CF1: library part CC0402JRNPO9BN221, "CAP CER 220PF 50V C0G/NPO 0402", Case Code (Imperial)=0402, Case Code (Metric)=1005, Dielectric=C0G, Dielectric Material=Ceramic, Insulation Resistance=10GR, Manufacturer=Yageo, Max Operating Temperature=125°C, Min Operating Temperature=-55°C, Package Quantity=1, Supplier Part Number 1=311-1416-1-ND, Temperature Coefficient=30ppm/°C, Tolerance=10%, Voltage=50V, Capacitance=220pF, Case/Package=0402, ComponentLink1Description=http://www.yageo.com/documents/recent/UPY-GP_NP0_16V-to-50V_16.pdf?src-supplier=Digi-Key, ComponentLink1URL=http://www.yageo.com/documents/recent/UPY-GP_NP0_16V-to-50V_16.pdf?src-supplier=Digi-Key, ComponentLink2Description=http://www.yageo.com/documents/recent/UPY-GP_NP0_16V-to-50V_8.pdf?src-supplier=Avnet+Europe, ComponentLink2URL=http://www.yageo.com/documents/recent/UPY-GP_NP0_16V-to-50V_8.pdf?src-supplier=Avnet+Europe, ComponentLink3Description=http://www.farnell.com/datasheets/1132289.pdf?src-supplier=Element14, ComponentLink3URL=http://www.farnell.com/datasheets/1132289.pdf?src-supplier=Element14, ComponentLink4Description=http://www.farnell.com/datasheets/2213336.pdf?src-supplier=Element14, ComponentLink4URL=http://www.farnell.com/datasheets/2213336.pdf?src-supplier=Element14, Depth=0.5mm, Dissipation Factor=0.1%, Height=0.5mm, Lead Free="Lead Free", Length=1mm, Manufacturer Part Number=CC0402JRNPO9BN221, Mount="Surface Mount", Number of Pins=2, Packaging="Tape and Reel", Pricing 1="1=0.1, 10=0.039, 100=0.0172, 500=0.01228, 1000=0.00965, 2500=0.00877, 5000=0.00807 (USD)", Radiation Hardening=No, REACH SVHC="No SVHC", Stock 1=97268, Supplier 1=Digi-Key, Termination=SMD/SMT, Thickness=0.022inch, Voltage Rating=50V, Width=0.02inch
CR1: library part EMK105ABJ225KV-F, "CAP CER 2.2UF 16V X5R 0402", Case Code (Imperial)=0402, Case Code (Metric)=1005, Manufacturer="Taiyo Yuden", Max Operating Temperature=85°C, Min Operating Temperature=-55°C, Supplier Part Number 1=587-6002-1-ND, Tolerance=10%, Voltage Rating=16V, Capacitance=2.2uF, Case/Package=0402, ComponentLink1Description=http://ds.yuden.co.jp/TYCOMPAS/ut/detail.do?productNo=EMK105ABJ225KV-F&amp;fileName=EMK105ABJ225KV-F_SS&amp;mode=specSheetDownload&src-supplier=Digi-Key, ComponentLink1URL=http://ds.yuden.co.jp/TYCOMPAS/ut/detail.do?productNo=EMK105ABJ225KV-F&amp;fileName=EMK105ABJ225KV-F_SS&amp;mode=specSheetDownload&src-supplier=Digi-Key, ComponentLink2Description="https://ds.yuden.co.jp/TYCOMPAS/ut/detail?pn=EMK105ABJ225KV-F &amp;u=M&src-supplier=Digi-Key", ComponentLink2URL="https://ds.yuden.co.jp/TYCOMPAS/ut/detail?pn=EMK105ABJ225KV-F &amp;u=M&src-supplier=Digi-Key", Lead Free="Lead Free", Manufacturer Part Number=EMK105ABJ225KV-F, Mount="Surface Mount", Packaging="Tape and Reel", Pricing 1="1=0.2, 10=0.139, 100=0.0706, 500=0.04834, 1000=0.04276, 2500=0.0409, 5000=0.03718 (USD)", Stock 1=755, Supplier 1=Digi-Key
D1 D3: "DIODE SCHOTTKY 30V 1A SOD123W", Manufacturer=Nexperia, Supplier Part Number 1=1727-5201-1-ND, Manufacturer Part Number=PMEG3010ER,115, Pricing 1="1=0.36, 10=0.29, 100=0.1669, 500=0.1545, 1000=0.10506 (USD)", Stock 1=75070, Supplier 1=Digi-Key
D2: "DIODE SCHOTTKY 30V 2A PMDU", Manufacturer="Rohm Semiconductor", ComponentLink1Description="New link", ComponentLink1URL=https://www.digikey.com/en/products/detail/rohm-semiconductor/RB060M-30TR/2336619?s=N4IgTCBcDaIEoCEAMA2JBZAtAZiQFThAF0BfIA, Manufacture Part no=RB060M-30TR
J1: "2.54mm Straight 1x10P 10 1 Plugin,P=2.54mm Female Headers ROHS", Manufacturer=BOOMELE, Package=Custom, ComponentLink1Description=LCSC, ComponentLink1URL=https://lcsc.com/product-detail/span-style-background-color-ff0-Female-span-Headers_BOOMELE-Boom-Precision-Elec-C35445_C35445.html, Manufacturer Part No=C35445
J3: "USB - Micro B Female USB 2 5 SMD USB Connectors RoHS", Manufacturer="Jing Extension of the Electronic Co.", ComponentLink1Description=http://www.amphenol-icc.com/media/wysiwyg/files/drawing/10118194.pdf?src-supplier=Digi-Key, ComponentLink1URL=http://www.amphenol-icc.com/media/wysiwyg/files/drawing/10118194.pdf?src-supplier=Digi-Key, ComponentLink2Description=https://cdn.amphenol-icc.com/media/wysiwyg/files/drawing/10118194.pdf?src-supplier=Mouser, ComponentLink2URL=https://cdn.amphenol-icc.com/media/wysiwyg/files/drawing/10118194.pdf?src-supplier=Mouser, ComponentLink3Description=https://cdn.amphenol-icc.com/media/wysiwyg/files/drawing/10118194.pdf?src-supplier=Verical, ComponentLink3URL=https://cdn.amphenol-icc.com/media/wysiwyg/files/drawing/10118194.pdf?src-supplier=Verical, Connector Type=USB,Receptacle, Gender=Receptacle, Link=https://lcsc.com/product-detail/USB-Connectors_Jing-Extension-of-the-Electronic-Co-C10418_C10418.html, Manufacturer Part Number=C10418, Mount="Surface Mount,Horizontal", Number of Contacts=5, Number of Ports=1, Number of Terminals=5, Orientation="Right Angle", Termination=Solder
J4: "CONN HEADER SMD 10POS 1.27MM", Color=Black, Contact Resistance=30mR, Current Rating=1A, Insulation Resistance=100MR, Manufacturer="Amphenol FCI", Max Operating Temperature=85°C, Max Voltage Rating (AC)=125V, Min Operating Temperature=-40°C, Package Quantity=600, Supplier Part Number 1=609-3695-6-ND, ComponentLink1Description=https://www.verical.com/server-webapp/html/getDatasheet?partID=177140&src-supplier=Verical, ComponentLink1URL=https://www.verical.com/server-webapp/html/getDatasheet?partID=177140&src-supplier=Verical, ComponentLink2Description=http://portal.fciconnect.com/Comergent/fci/drawing/20021121.pdf?src-supplier=Avnet, ComponentLink2URL=http://portal.fciconnect.com/Comergent/fci/drawing/20021121.pdf?src-supplier=Avnet, ComponentLink3Description=https://cdn.amphenol-icc.com/media/wysiwyg/files/drawing/20021121.pdf?src-supplier=Digi-Key, ComponentLink3URL=https://cdn.amphenol-icc.com/media/wysiwyg/files/drawing/20021121.pdf?src-supplier=Digi-Key, ComponentLink4Description=http://portal.fciconnect.com/Comergent/fci/drawing/20021121.pdf?src-supplier=Avnet+Europe, ComponentLink4URL=http://portal.fciconnect.com/Comergent/fci/drawing/20021121.pdf?src-supplier=Avnet+Europe, ComponentLink5Description=https://media.digikey.com/pdf/Data%20Sheets/FCI%20PDFs/Minitek%20127_Catalog.pdf?src-supplier=Digi-Key, ComponentLink5URL=https://media.digikey.com/pdf/Data%20Sheets/FCI%20PDFs/Minitek%20127_Catalog.pdf?src-supplier=Digi-Key, ComponentLink6Description=http://portal.fciconnect.com/Comergent//fci/drawing/20021121.pdf?src-supplier=Mouser, ComponentLink6URL=http://portal.fciconnect.com/Comergent//fci/drawing/20021121.pdf?src-supplier=Mouser, Connector Type="Male Pin,Header", Contact Material="Copper Alloy,Copper,Gold", Contact Mating Length=0.12inch, Contact Plating=Gold, Depth=3.4mm, Gender=Male, Housing Color=Black, Housing Material=Thermoplastic, Length=6.35mm, Manufacturer Part Number=20021121-00010C4LF, Mount="Surface Mount", Number of Contacts=10, Number of Positions=10, Number of Rows=2, Orientation=Straight, Packaging="Tape and Reel", Pitch=1.27mm, Pricing 1="1=0.87, 10=0.761, 100=0.6563 (USD)", Radiation Hardening=No, REACH SVHC="No SVHC", Row Spacing=0.05inch, Stack Height=3mm, Stock 1=0, Supplier 1=Digi-Key, Termination=Solder, Voltage Rating=125V
J5: "CBL PLUG-OF-NAILS 10-PIN W/LEGS", Manufacturer=Tag-Connect, Package Quantity=1, Supplier Part Number 1=TC2050-IDC-ND, ComponentLink1Description=http://www.tag-connect.com/Materials/TC2050-IDC%20Datasheet.pdf?src-supplier=Digi-Key, ComponentLink1URL=http://www.tag-connect.com/Materials/TC2050-IDC%20Datasheet.pdf?src-supplier=Digi-Key, Manufacturer Part Number=TC2050-IDC, Pricing 1="1=40.17 (USD)", Stock 1=59, Supplier 1=Digi-Key
J6: "SMD Battery Holders, Clips & Contacts RoHS", Manufacturer=Q&J, Package=Cuctom, Manufacturer Part No=CR1220-2
J7 J8 J#1: "P=5.0mm Screw terminal RoHS", Manufacturer="Ningbo Kangnex Elec", Package=Custom
  J7: Manufacturer Part No=WJ301V-5.0-3P
  J8 J#1: Manufacturer Part No=WJ301V-5.0-2P
LED1: "Red 625nm 0402 Light Emitting Diodes (LED) RoHS", Manufacturer=TOGIALED, Package=0402, Manufacturer Part No=TJ-S1005SW4TGLC2R-A5
LZ1: "10uH ±20% 1.6A 230mΩ SMD,4.75x4.2x2mm Inductors (SMD) RoHS", Manufacturer=COILMX, Package=Custom, Manufacturer Part No=MS0420-100M
P1: "Wire Connecting Pad"
P2: "Test Point ON"
P12 P13 P14 P15 P16: library part "TEST POINT", "Test Point ON"
P17: library part "2 Pin JST Connector", "2 PIN JST Connector"
Q1: "20V 1.6A 500mW 115mΩ@4.5V,1.6A 1.5V@250μA P Channel SOT-23 MOSFETs ROHS", Manufacturer=UMW, Package=SOT-23, Manufacturer Part No=FDN338P
Q3: "MOSFET N-CH 100V .1A SOT23-3", Case/Package=SOT-23, Continuous Drain Current (ID)=100mA, Drain to Source Breakdown Voltage=100V, Drain to Source Resistance=10R, Gate to Source Voltage (Vgs)=20V, Input Capacitance=40pF, Manufacturer="Diodes Zetex", Max Operating Temperature=150°C, Max Power Dissipation=330mW, Min Operating Temperature=-55°C, Package Quantity=3000, Supplier Part Number 1=ZVN3310FCT-ND, Threshold Voltage=2.4V, ComponentLink1Description=http://www.diodes.com/_files/datasheets/ZVN3310F.pdf?src-supplier=Digi-Key, ComponentLink1URL=http://www.diodes.com/_files/datasheets/ZVN3310F.pdf?src-supplier=Digi-Key, Current=100mA, Current Rating=100mA, Drain to Source Voltage (Vdss)=100V, Dual Supply Voltage=100V, Element Configuration=Single, Fall Time=5ns, Height=1.02mm, Lead Free="Lead Free", Length=3.04mm, Manufacturer Part Number=ZVN3310FTA, Mount="Surface Mount", Nominal Vgs=2.4V, Number of Channels=1, Number of Elements=1, Number of Pins=3, On-State Resistance=10R, Packaging="Tape and Reel", Power Dissipation=330mW, Pricing 1="1=0.59, 10=0.517, 25=0.4852, 100=0.3522, 250=0.33972, 500=0.29432, 1000=0.25048 (USD)", Radiation Hardening=No, Rds On Max=10R, REACH SVHC="No SVHC", Rise Time=5ns, Stock 1=16974, Supplier 1=Digi-Key, Termination=SMD/SMT, Turn-Off Delay Time=4ns, Turn-On Delay Time=3ns, Voltage=100V, Voltage Rating (DC)=100V, Weight=0.000282oz, Width=1.4mm
Q4: "SOT-23 MOSFETs ROHS", Manufacturer=UMW, Package=SOT-23, ComponentLink1Description=LCSC, ComponentLink1URL=https://lcsc.com/product-detail/MOSFETs_UMW-Youtai-Semiconductor-Co-Ltd-FDN335N_C347512.html, Manufacturer Part No=FDN335N
R1: library part RTT02471JTH, "470 ±5% 1/16W ±100ppm/°C 0402 Chip Resistor - Surface Mount RoHS", Manufacturer=RALEC, Package=0402, Manufacturer Part No=RTT02471JTH
R2: library part RMCF0201FT1K50, "RES SMD 1.5K OHM 1% 1/20W 0201", Case Code (Imperial)=0201, Case Code (Metric)=0603, Manufacturer="Stackpole Electronics", Max Operating Temperature=125°C, Max Power Dissipation=50mW, Min Operating Temperature=-55°C, Resistance=1.5kR, Resistor Type="Thick Film", Supplier Part Number 1=RMCF0201FT1K50CT-ND, Temperature Coefficient=200ppm/°C, Tolerance=1%, Case/Package=0201, Category="Chip SMD Resistors", ComponentLink1Description=https://www.seielect.com/Catalog/SEI-RMCF_RMCP.pdf?src-supplier=Digi-Key, ComponentLink1URL=https://www.seielect.com/Catalog/SEI-RMCF_RMCP.pdf?src-supplier=Digi-Key, ComponentLink2Description=https://www.seielect.com/catalog/SEI-Packaging.pdf?src-supplier=Digi-Key, ComponentLink2URL=https://www.seielect.com/catalog/SEI-Packaging.pdf?src-supplier=Digi-Key, ComponentLink3Description=https://www.seielect.com/catalog/SEI-RMCF_RMCP.pdf?src-supplier=Avnet, ComponentLink3URL=https://www.seielect.com/catalog/SEI-RMCF_RMCP.pdf?src-supplier=Avnet, Contact Plating=Tin,Matte, Height=0.009inch, Length=0.024inch, Manufacturer Part Number=RMCF0201FT1K50, Mount="Surface Mount", Number of Terminations=2, Packaging="Tape and Reel", Pricing 1="1=0.10000, 10=0.02700, 100=0.01090, 1000=0.00488, 2500=0.00423, 5000=0.00350 (USD)", Radiation Hardening=No, RoHS=Yes, RoHS Compliant=Yes, Series=RMCF, Stock 1=151457, Supplier 1=Digi-Key, Width=0.012inch